# Altium PCB PCB1.PcbDoc (part 1 of 2)
Units mil, origin at the board's own origin, x right, y up, seen from the top; angles counter-clockwise.
Board outline 6000 x 4000 mil, 2 copper layers (Top Layer, Bottom Layer); 136 components, 92 nets, 517 pads, 0 vias.
Unrouted connection lines stored in the file: 335.
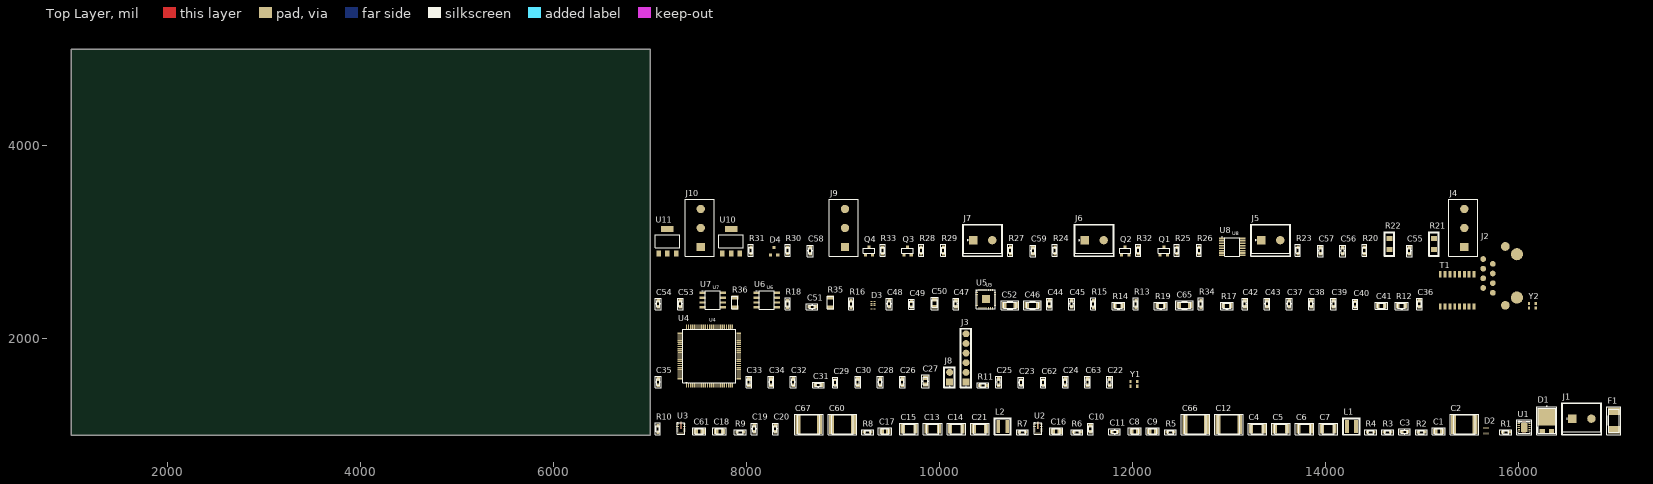
[diagram p0: Top Layer view]
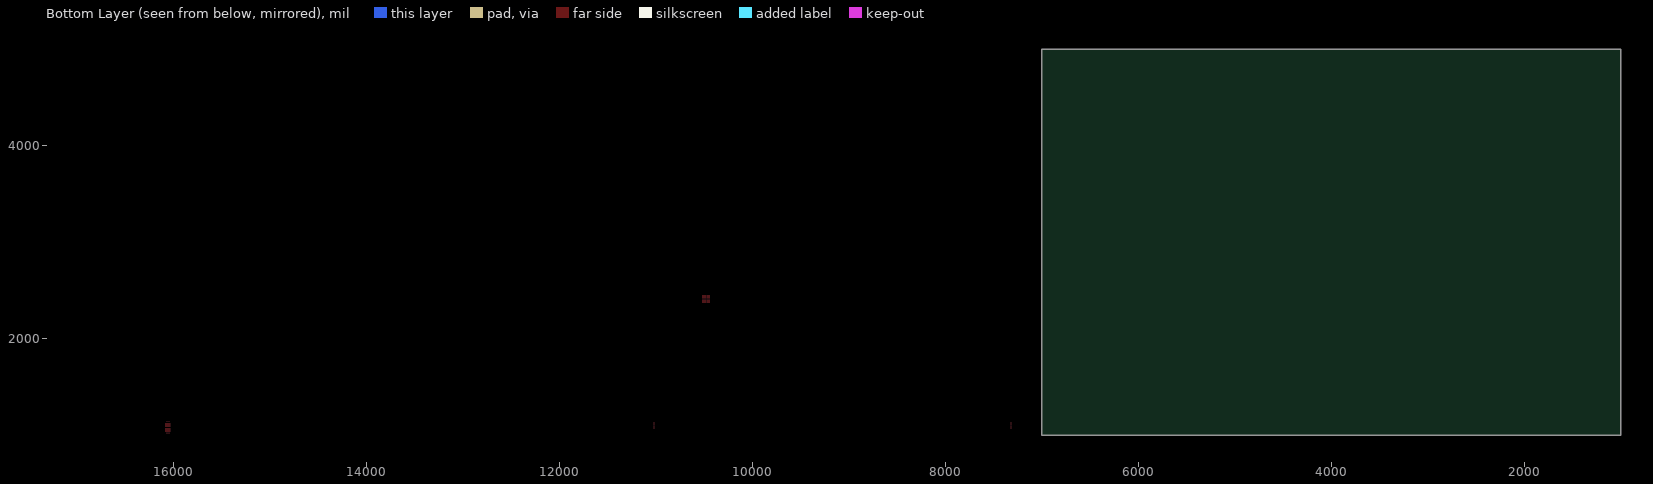
[diagram p1: Bottom Layer view, seen from below]

## Layer stack, top to bottom
Top Solder: solder mask 0.4, Solder Resist, Dk 3.5
Top Layer: signal copper 1.4
Dielectric 1: dielectric 12.6, FR-4, Dk 4.8
Bottom Layer: signal copper 1.4
Bottom Solder: solder mask 0.4, Solder Resist, Dk 3.5

## Board outline
1000,1000 7000,1000 7000,5000 1000,5000

## Design rules (kind name [scope] priority, off if disabled: settings)
Clearance [All] p1: gap=10 ignorepadtopadclearanceinfootprint=FALSE
PolygonConnect [All] p1: connectstyle=Relief reliefconductorwidth=10 reliefentries=4 polygonreliefangle="90 Angle" airgapwidth=10
RoutingVias [All] p1: holewidth=28 width=50 viastyle="Through Hole" minholewidth=28 minwidth=50 maxholewidth=28 maxwidth=50
SolderMaskExpansion [All] p1: expansion=0 istentingtop=FALSE
SupplyNets "Schematic Supply Nets_6" [InNet('3.3V')] p1: voltage=0.000
SupplyNets "Schematic Supply Nets_5" [InNet('B5_SW')] p2: voltage=0.000
SupplyNets "Schematic Supply Nets_4" [InNet('B3_SW')] p3: voltage=0.000
SupplyNets "Schematic Supply Nets_3" [InNet('24V')] p4: voltage=0.000
SupplyNets "Schematic Supply Nets_2" [InNet('VCAP')] p5: voltage=0.000
SupplyNets "Schematic Supply Nets_1" [InNet('5V')] p6: voltage=0.000
SupplyNets "Schematic Supply Nets" [InNet('GND')] p7: voltage=0.000
Width [All] p1: maxlimit=10 minlimit=10 preferedwidth=10
30 further rules are at their usual default settings.

## Classes and differential pairs
component class S4: C55 C56 C57 C58 C59 D4 J4 J5 J6 J7 J9 J10 Q1 Q2 Q3 Q4 R20 R21 R22 R23 R24 R25 R26 R27 R28 R29 R30 R31 R32 R33 U8 U10 U11
component class S3: C36 C37 C38 C39 C40 C41 C42 C43 C44 C45 C46 C47 C48 C49 C50 C51 C52 C53 C54 C65 D3 J2 R12 R13 R14 R15 R16 R17 R18 R19 R34 R35 R36 T1 U5 U6 U7 Y2
component class S2: C22 C23 C24 C25 C26 C27 C28 C29 C30 C31 C32 C33 C34 C35 C62 C63 J3 J8 R11 U4 Y1
component class S1: C1 C2 C3 C4 C5 C6 C7 C8 C9 C10 C11 C12 C13 C14 C15 C16 C17 C18 C19 C20 C21 C60 C61 C66 C67 D1 D2 F1 J1 L1 L2 R1 R2 R3 R4 R5 R6 R7 R8 R9 R10 U1 U2 U3

## Components (designator, comment, footprint, x,y, rotation, side; value= is the part's Value field where it differs from the comment)
C1 "C0805C224K1RACTU" GW_0805_KEMET_NOMINAL 15175,1040 r0 top value=220nF10%100VX7R
C2 "C5750X7R2A475K230KA" GW_C5750_TDK_REFLOW 15440,1110 r0 top value=4.7uF10%100VX7R
C3 "10 nF" GW_0603_KEMET_NOMINAL 14820,1035 r0 top
C4 "15 uF por unidad; 45 uF nominal banco" GW_C3225_TDK_REFLOW 13295,1065 r0 top
C5 "15 uF por unidad; 45 uF nominal banco" GW_C3225_TDK_REFLOW 13540,1065 r0 top
C6 "15 uF por unidad; 45 uF nominal banco" GW_C3225_TDK_REFLOW 13785,1065 r0 top
C7 "C3225X7R1C156M250AB" GW_C3225_TDK_REFLOW 14030,1065 r0 top value=15uF20%16VX7R
C8 "220 nF" GW_0805_KEMET_NOMINAL 12025,1040 r0 top
C9 "220 nF" GW_0805_KEMET_NOMINAL 12210,1040 r0 top
C10 "100 nF" GW_0603_KEMET_NOMINAL 11565,1065 r90 top
C11 "20 pF" GW_0603_KEMET_NOMINAL 11815,1035 r0 top
C12 "C5750X7R2A475K230KA" GW_C5750_TDK_REFLOW 13000,1110 r0 top value=4.7uF10%100VX7R
C13 "15 uF por unidad; 45 uF nominal banco" GW_C3225_TDK_REFLOW 9930,1065 r0 top
C14 "15 uF por unidad; 45 uF nominal banco" GW_C3225_TDK_REFLOW 10175,1065 r0 top
C15 "15 uF por unidad; 45 uF nominal banco" GW_C3225_TDK_REFLOW 9685,1065 r0 top
C16 "C0805C225K5RACTU" GW_0805_KEMET_NOMINAL 11210,1040 r0 top value=2.2uF10%50VX7R
C17 "C0805C224K1RACTU" GW_0805_KEMET_NOMINAL 9435,1040 r0 top value=220nF10%100VX7R
C18 "220 nF" GW_0805_KEMET_NOMINAL 7720,1040 r0 top
C19 "100 nF" GW_0603_KEMET_NOMINAL 8080,1065 r90 top
C20 "20 pF" GW_0603_KEMET_NOMINAL 8300,1065 r90 top
C21 "C3225X7R1C156M250AB" GW_C3225_TDK_REFLOW 10420,1065 r0 top value=15uF20%16VX7R
C22 "100 nF" GW_0603_KEMET_NOMINAL 11765,1550 r90 top
C23 "1 uF" GW_SAMSUNG_CL10_1608_REFLOW 10845,1545 r90 top
C24 "100 nF" GW_0603_KEMET_NOMINAL 11305,1550 r90 top
C25 "10 nF" GW_0603_KEMET_NOMINAL 10615,1550 r90 top
C26 "100 nF" GW_0603_KEMET_NOMINAL 9615,1550 r90 top
C27 "4.7 uF" GW_0805_KEMET_NOMINAL 9855,1560 r90 top
C28 "100 nF" GW_0603_KEMET_NOMINAL 9385,1550 r90 top
C29 "1 uF" GW_SAMSUNG_CL10_1608_REFLOW 8920,1545 r90 top
C30 "100 nF" GW_0603_KEMET_NOMINAL 9155,1550 r90 top
C31 "100 nF" GW_0603_KEMET_NOMINAL 8745,1520 r0 top
C32 "100 nF" GW_0603_KEMET_NOMINAL 8485,1550 r90 top
C33 "2.2 uF" GW_0603_KEMET_NOMINAL 8025,1550 r90 top
C34 "2.2 uF" GW_0603_KEMET_NOMINAL 8255,1550 r90 top
C35 "100 nF" GW_0603_KEMET_NOMINAL 7085,1550 r90 top
C36 "10 nF" GW_0603_KEMET_NOMINAL 14975,2360 r90 top
C37 "2 nF" GW_0603_KEMET_NOMINAL 13625,2360 r90 top
C38 "10 nF" GW_0603_KEMET_NOMINAL 13855,2360 r90 top
C39 "100 nF" GW_0603_KEMET_NOMINAL 14085,2360 r90 top
C40 "1 uF" GW_SAMSUNG_CL10_1608_REFLOW 14310,2355 r90 top
C41 "10 uF" GW_SAMSUNG_CL21_2012_REFLOW 14580,2340 r0 top
C42 "100 nF" GW_0603_KEMET_NOMINAL 13165,2360 r90 top
C43 "100 nF" GW_0603_KEMET_NOMINAL 13395,2360 r90 top
C44 "100 nF" GW_0603_KEMET_NOMINAL 11140,2360 r90 top
C45 "100 nF" GW_0603_KEMET_NOMINAL 11370,2360 r90 top
C46 "C1206C102KGRACAUTO" GW_C1206_KEMET_C1076_DENSITY_B 10965,2345 r0 top value="1 nF"
C47 "10 nF" GW_0603_KEMET_NOMINAL 10170,2360 r90 top
C48 "100 nF" GW_0603_KEMET_NOMINAL 9480,2360 r90 top
C49 "1 uF" GW_SAMSUNG_CL10_1608_REFLOW 9710,2355 r90 top
C50 "10 uF" GW_SAMSUNG_CL21_2012_REFLOW 9950,2365 r90 top
C51 "100 nF" GW_0603_KEMET_NOMINAL 8680,2330 r0 top
C52 "C1206C102KGRACAUTO" GW_C1206_KEMET_C1076_DENSITY_B 10730,2345 r0 top value="1 nF"
C53 "100 nF" GW_0603_KEMET_NOMINAL 7315,2360 r90 top
C54 "100 nF" GW_0603_KEMET_NOMINAL 7085,2360 r90 top
C55 "10 nF" GW_0603_KEMET_NOMINAL 14870,2910 r90 top
C56 "100 nF" GW_0603_KEMET_NOMINAL 14180,2910 r90 top
C57 "10 nF" GW_0603_KEMET_NOMINAL 13950,2910 r90 top
C58 "100 nF" GW_0603_KEMET_NOMINAL 8660,2910 r90 top
C59 "100 nF" GW_0603_KEMET_NOMINAL 10970,2910 r90 top
C60 "C5750X7R2A475K230KA" GW_C5750_TDK_REFLOW 8995,1110 r0 top value=4.7uF10%100VX7R
C61 "C0805C225K5RACTU" GW_0805_KEMET_NOMINAL 7510,1040 r0 top value=2.2uF10%50VX7R
C62 "1 uF" GW_SAMSUNG_CL10_1608_REFLOW 11075,1545 r90 top
C63 "100 nF" GW_0603_KEMET_NOMINAL 11535,1550 r90 top
C65 "C1206C102KGRACAUTO" GW_C1206_KEMET_C1076_DENSITY_B 12540,2345 r0 top value="1 nF"
C66 "C5750X7R2A475K230KA" GW_C5750_TDK_REFLOW 12655,1110 r0 top value=4.7uF10%100VX7R
C67 "C5750X7R2A475K230KA" GW_C5750_TDK_REFLOW 8645,1110 r0 top value=4.7uF10%100VX7R
D1 "SS3P6L-M3_86A" GW_SS3P6L_VISHAY_88987 16295,1190 r0 top
D2 "TDS3311P.C" GW_TDS3311P_SEMTECH 15665,1045 r0 top value="33V working;42Vmax specified35A pulse"
D3 "TPD4E05U06DQAR" GW_DQA0010A_TI 9310,2345 r0 top
D4 "CDSOT23-SM712" GW_SM712_BOURNS 8285,2905 r0 top
F1 "0451002.MRL" GW_0451_LITTELFUSE 16990,1150 r90 top
J1 "TB002-500-02BE" GW_TB002_500_2P_SAMESKY 16560,1170 r0 top
J2 "SS-7188S-A-NF" GW_SS7188SANF_STEWART 15985,2425 r90 top
J3 "6 posiciones" GW_WRPHD_6X1_254_WURTH 10275,1550 r90 top
J4 "TB002-500-03BE" GW_TB002_500_3P_SAMESKY 15440,2950 r90 top value="3-pole5mm terminal block"
J5 "TB002-500-02BE" GW_TB002_500_2P_SAMESKY 13335,3020 r0 top value="2-pole5mm terminal block"
J6 "TB002-500-02BE" GW_TB002_500_2P_SAMESKY 11505,3020 r0 top value="2-pole5mm terminal block"
J7 "TB002-500-02BE" GW_TB002_500_2P_SAMESKY 10350,3020 r0 top value="2-pole5mm terminal block"
J8 "2 posiciones" GW_WRPHD_2X1_254_WURTH 10105,1550 r90 top
J9 "TB002-500-03BE" GW_TB002_500_3P_SAMESKY 9020,2950 r90 top value="3-pole5mm terminal block"
J10 "TB002-500-03BE" GW_TB002_500_3P_SAMESKY 7525,2950 r90 top value="3-pole5mm terminal block"
L1 "6.8 uH" GW_XAL4030_COILCRAFT 14270,1090 r0 top
L2 "10 uH" GW_XAL4040_COILCRAFT 10655,1090 r0 top
Q1 "MMBT3904-7-F" GW_MMBT3904_BEC_DIODES 12325,2910 r0 top value="NPN 40V200mA"
Q2 "DMP2035U-7" GW_DMP2035U_GSD_DIODES 11925,2910 r0 top value=PMOS20V;VGS±10V
Q3 "MMBT3904-7-F" GW_MMBT3904_BEC_DIODES 9670,2910 r0 top value="NPN 40V200mA"
Q4 "DMP2035U-7" GW_DMP2035U_GSD_DIODES 9270,2910 r0 top value=PMOS20V;VGS±10V
R1 "RC0603FR-07768KL" GW_RC0603_YAGEO_REFLOW 15870,1030 r0 top value=768kOhm1%0.1W75V
R2 "RC0603FR-0713K3L" GW_RC0603_YAGEO_REFLOW 14995,1030 r0 top value=13.3kOhm1%0.1W75V
R3 "RC0603FR-0733K2L" GW_RC0603_YAGEO_REFLOW 14645,1030 r0 top value=33.2kOhm1%0.1W75V
R4 "RC0603FR-0730K1L" GW_RC0603_YAGEO_REFLOW 14470,1030 r0 top value=30.1kOhm1%0.1W75V
R5 "100 kOhm" GW_RC0603_YAGEO_REFLOW 12395,1030 r0 top
R6 "100 kOhm" GW_RC0603_YAGEO_REFLOW 11425,1030 r0 top
R7 "43.2 kOhm" GW_RC0603_YAGEO_REFLOW 10860,1030 r0 top
R8 "100 kOhm" GW_RC0603_YAGEO_REFLOW 9255,1030 r0 top
R9 "100 kOhm" GW_RC0603_YAGEO_REFLOW 7935,1030 r0 top
R10 "24.9 kOhm" GW_RC0603_YAGEO_REFLOW 7080,1065 r90 top
R11 "10 kOhm" GW_RC0603_YAGEO_REFLOW 10450,1515 r0 top
R12 "CRCW080575R0FKEA" GW_CRCW0805_VISHAY_20035_REFLOW 14790,2340 r0 top value="75 Ohm"
R13 "6.49 kOhm" GW_RC0603_YAGEO_REFLOW 12035,2360 r90 top
R14 "CRCW080575R0FKEA" GW_CRCW0805_VISHAY_20035_REFLOW 11855,2340 r0 top value="75 Ohm"
R15 "2.49 kOhm" GW_RC0603_YAGEO_REFLOW 11595,2360 r90 top
R16 "10 kOhm" GW_RC0603_YAGEO_REFLOW 9085,2360 r90 top
R17 "CRCW080575R0FKEA" GW_CRCW0805_VISHAY_20035_REFLOW 12980,2340 r0 top value="75 Ohm"
R18 "10 kOhm" GW_RC0603_YAGEO_REFLOW 8425,2360 r90 top
R19 "CRCW080575R0FKEA" GW_CRCW0805_VISHAY_20035_REFLOW 12295,2340 r0 top value="75 Ohm"
R20 "562 Ohm" GW_RC0603_YAGEO_REFLOW 14405,2915 r90 top
R21 "MM204F1K00TKRTR3K0" GW_MM204_FIRSTOHM 15125,2980 r90 top
R22 "MM204F1K00TKRTR3K0" GW_MM204_FIRSTOHM 14665,2980 r90 top
R23 "562 Ohm" GW_RC0603_YAGEO_REFLOW 13715,2915 r90 top
R24 "10 kOhm" GW_RC0603_YAGEO_REFLOW 11195,2915 r90 top
R25 "RC0603FR-07100RL" GW_RC0603_YAGEO_REFLOW 12460,2915 r90 top value="100 Ohm"
R26 "RC0603FR-074K7L" GW_RC0603_YAGEO_REFLOW 12690,2915 r90 top value="4.7 kOhm"
R27 "2.49 kOhm" GW_RC0603_YAGEO_REFLOW 10735,2915 r90 top
R28 "RC0603FR-07100RL" GW_RC0603_YAGEO_REFLOW 9810,2915 r90 top value="100 Ohm"
R29 "RC0603FR-074K7L" GW_RC0603_YAGEO_REFLOW 10040,2915 r90 top value="4.7 kOhm"
R30 "10 kOhm" GW_RC0603_YAGEO_REFLOW 8425,2915 r90 top
R31 "2.49 kOhm" GW_RC0603_YAGEO_REFLOW 8045,2915 r90 top
R32 "RC0603FR-074K7L" GW_RC0603_YAGEO_REFLOW 12060,2915 r90 top value="4.7 kOhm"
R33 "RC0603FR-074K7L" GW_RC0603_YAGEO_REFLOW 9410,2915 r90 top value="4.7 kOhm"
R34 "RC0603FR-071ML" GW_RC0603_YAGEO_REFLOW 12710,2360 r90 top
R35 "CRCW1206120RFKEA" GW_CRCW1206_VISHAY_20035_REFLOW 8870,2375 r90 top value="120 Ohm"
R36 "CRCW1206120RFKEA" GW_CRCW1206_VISHAY_20035_REFLOW 7880,2375 r90 top value="120 Ohm"
T1 "HX1188FNL" GW_HX1188FNL_PULSE 15365,2500 r0 top
U1 "TPS26620DRCR" GW_DRC0010J_TI_TPS2662_EPU 16060,1080 r0 top
U2 "LMR36015FBRNXR" GW_RNX0012A_TI 11020,1070 r0 top
U3 "LMR36015FBRNXR" GW_RNX0012A_TI 7320,1070 r0 top
U4 "STM32H723VET6" GW_LQFP100_ST_1L 7615,1820 r0 top
U5 "DP83826IRHBR" GW_RHB0032M_TI 10480,2410 r0 top
U6 "THVD1420DR" GW_SOIC8_1P27_5P4 8210,2400 r0 top
U7 "ATA6561-GAQW" GW_SOIC8_1P27_5P4 7650,2400 r0 top
U8 "ISO1212DBQR" GW_DBQ0016A_TI 13035,2950 r0 top
U10 "BSP75NTA" GW_BSP75N_SOT223_DN_DIODES 7840,3010 r0 top
U11 "BSP75NTA" GW_BSP75N_SOT223_DN_DIODES 7180,3010 r0 top
Y1 "KC2016Z25.0000C15XXK" GW_KC2016Z_KYOCERA 12015,1530 r0 top
Y2 "KC2016Z25.0000C15XXK" GW_KC2016Z_KYOCERA 16145,2340 r0 top

## Footprints (in the part's own frame and the unit in brackets; to place one, negate y for a bottom-side part, rotate by r counter-clockwise, add the part's x,y. Pads: shape width x height; smd on the part's side, far side on the other; paste and mask are expansions set on the pad)
GW_0451_LITTELFUSE [mm] "Littelfuse451/453 manufacturer recommended pad layout; saved historical p371; current2025p4 identical dimension list; Nonpolar project1/2; pad1.955x3.15 rounds1.96; centers4.905; outside6.86,inside2.95. No holder."
  rect 1.955x3.15 smd paste+0 mask+0.025: 1(-2.452,0) 2(2.452,0)
  silkscreen extent -3.68,-1.83 3.68,1.83, body extent -3.05,-1.35 3.05,1.35, height 2.69
GW_0603_KEMET_NOMINAL [mm] "KEMET C0603C680J5GACTU exact manufacturer spec; shared1608 body; KEMET C1027Table3p12 nominal1608 lands; Nominal C=.80,Y=.95,X=1.00; manufacturer land geometry reused for same0603 body. Timing option DNP."
  rect 0.95x1 smd paste+0 mask+0.025: 1(-0.8,0) 2(0.8,0)
  silkscreen extent -1.53,-0.75 1.53,0.75, body extent -0.8,-0.4 0.8,0.4, height 0.87
GW_0805_KEMET_NOMINAL [mm] "KEMET exact0805 spec body/termination dimensions; KEMET C1027 p12 Table3 nominal2012 reflow lands transferred to mechanically matching commercial0805; Nominal C=.90,Y=1.15,X=1.45. Mechanical reuse from KEMET table; no COTS electrical qualification claimed; same2012case checked."
  rect 1.15x1.45 smd paste+0 mask+0.025: 1(-0.9,0) 2(0.9,0)
  silkscreen extent -1.73,-0.97 1.73,0.97, body extent -1,-0.63 1,0.63, height 1.4
GW_BSP75N_SOT223_DN_DIODES [mm] "Diodes DS33016 Rev7-2 Jan2024 p1 Top View Pin Out, p8 Suggested Pad Layout; functional pad identifiers preserve original symbol pins; C2.30 C1=6.40 X1.20 X1=3.30 Y1.60 Y1=1.60 Y2=8.00mm; mask+.05/paste1:1 explicit prototype process."
  rect 1.2x1.6 smd paste+0 mask+0.05: D(0,-3.2) IN(-2.3,-3.2) S(2.3,-3.2)
  rect 3.3x1.6 smd paste+0 mask+0.05: S_TAB(0,3.2)
  silkscreen extent -3.25,-1.75 3.25,1.75
GW_C1206_KEMET_C1076_DENSITY_B [mm] "KEMET C1076p10 Table3 DensityB1206:C1.50,Y1.15,X1.80mm; centers3.00; gap1.85; body3.2x1.6mm. Mask+.05/paste1:1 process choices, not safety insulation geometry."
  rect 1.15x1.8 smd paste+0 mask+0.05: 1(-1.5,0) 2(1.5,0)
  silkscreen extent -2.32,-1.15 2.32,1.15, body extent -1.6,-0.8 1.6,0.8, height 1.8
GW_C3225_TDK_REFLOW [mm] "TDK official C3225X7R1C156M250AB product page lands PA2.0-2.4 PB1.0-1.2 PC1.9-2.5; TI table10-1 rated45uF example; Selected PA2.20 gap/PB1.10 padlength/PC2.50 height, no generic1210 default; 16V output only."
  rect 1.1x2.5 smd paste+0 mask+0.025: 1(-1.65,0) 2(1.65,0)
  silkscreen extent -2.45,-1.5 2.45,1.5, body extent -1.6,-1.25 1.6,1.25, height 2.5
GW_C5750_TDK_REFLOW [mm] "TDK C5750X7R2A475K230KA exact2014web-derived PDF p1 lands,p2 DCbias; current official product page same PA/PB/PC; Selected PA4.40 gap/PB1.30 length/PC5.00 height within manufacturer4.1-4.8/1.2-1.4/4-5 ranges."
  rect 1.3x5 smd paste+0 mask+0.025: 1(-2.85,0) 2(2.85,0)
  silkscreen extent -3.75,-2.75 3.75,2.75, body extent -2.85,-2.5 2.85,2.5, height 2.3
GW_CRCW0805_VISHAY_20035_REFLOW [mm] "Vishay20035p9 reflow0805 G1.00 Y0.95 X1.45 Z2.90mm; centers1.95mm; body2.0x1.25mm. Mask+.05/paste1:1 prototype process choices."
  rect 0.95x1.45 smd paste+0 mask+0.05: 1(-0.975,0) 2(0.975,0)
  silkscreen extent -1.7,-0.97 1.7,0.97, body extent -1,-0.63 1,0.63, height 0.55
GW_CRCW1206_VISHAY_20035_REFLOW [mm] "Vishay20035p9 REFLOW1206 G1.50 Y1.05 X1.80 Z3.60mm;centres2.55mm;body3.2x1.6mm. Mask+.05/paste1:1 prototype process."
  rect 1.05x1.8 smd paste+0 mask+0.05: 1(-1.275,0) 2(1.275,0)
  silkscreen extent -1.6,-0.8 1.6,0.8
GW_DBQ0016A_TI [mil] "SLLSEY7G table4-2 p4; DBQ0016A 4214846/A PDF pp44-46;"
  rrect25% 63x16 smd paste+0 mask+2: 1(-106.3,87.5) 2(-106.3,62.5) 3(-106.3,37.5) 4(-106.3,12.5) 5(-106.3,-12.5) 6(-106.3,-37.5) 7(-106.3,-62.5) 8(-106.3,-87.5) 9(106.3,-87.5) 10(106.3,-62.5) 11(106.3,-37.5) 12(106.3,-12.5) 13(106.3,12.5) 14(106.3,37.5) 15(106.3,62.5) 16(106.3,87.5)
  silkscreen extent -114,-96 77,107
GW_DMP2035U_GSD_DIODES [mm] "Diodes DS31830 Rev11-2 June2025 p1 top view/order,p2 electrical,p6 suggested lands; lower-left B/G,lower-right E/S,upper C/D; functional IDs intentional. C2.0 X.8 X1=1.35 Y.9 Y1=2.9mm; mask+.05,paste1:1."
  rect 0.8x0.9 smd paste+0 mask+0.05: D(0,1) G(-0.95,-1) S(0.95,-1)
  silkscreen extent -1.5,-0.7 1.5,0.7
GW_DQA0010A_TI [mm] "TI SLVSBO7O DQA0010A board/stencil pp29-30;0.565x0.2 leads,3/8=0.565x0.4;pitch0.5,row0.835mm. R0.05typ usingAltiumhalf-side50/25percent,NSMD+.05. GNDpaste0.565x0.36 windows,0.10mm stencil."
  rrect50% 0.565x0.2 smd paste+0 mask+0.05: 1(-0.417,1) 2(-0.417,0.5) 4(-0.417,-0.5) 5(-0.417,-1) 6(0.417,-1) 7(0.417,-0.5) 9(0.417,0.5) 10(0.417,1)
  rrect25% 0.565x0.4 smd paste-1 mask+0.05: 3(-0.417,0) 8(0.417,0)
GW_DRC0010J_TI_TPS2662_EPU [mm] "TI SLVSDT4F DRC0010J pp43-45 copper of GW_DRC0010J_TI_TPS2662_EP11 with EP segments 11A-11D renamed to 11 so all five EP copper pieces inherit pin 11 (RTN_EP / EF_RTN) through same-designator pads."
  rrect42% 0.6x0.24 smd paste+0 mask+0.05: 1(-1.4,1) 2(-1.4,0.5) 3(-1.4,0) 4(-1.4,-0.5) 5(-1.4,-1) 6(1.4,-1) 7(1.4,-0.5) 8(1.4,0) 9(1.4,0.5) 10(1.4,1)
  rrect40% 0.25x0.51 smd paste-1 mask+0.05: 11(-0.25,-1.445) 11(-0.25,1.445) 11(0.25,-1.445) 11(0.25,1.445)
  rrect6% 1.65x2.4 smd paste-1 mask+0.05: 11(0,0)
  Top Layer region: 0.125,1.36 0.375,1.36 0.375,1.7 0.125,1.7
  Top Layer region: 0.125,-1.7 0.375,-1.7 0.375,-1.36 0.125,-1.36
  Top Layer region: -0.375,1.36 -0.125,1.36 -0.125,1.7 -0.375,1.7
  Top Layer region: -0.375,-1.7 -0.125,-1.7 -0.125,-1.36 -0.375,-1.36
  Top Layer region: -0.75,0.1 0.75,0.1 0.75,1.16 -0.75,1.16
  Top Layer region: -0.75,-1.16 0.75,-1.16 0.75,-0.1 -0.75,-0.1
  silkscreen extent -1.95,-1.95 1.95,1.95, body extent -1.5,-1.5 1.5,1.5, height 1
GW_HX1188FNL_PULSE [mil] "Pulse HX1188FNL revB 30-May-2014 sheets2-3 PS-2005.002-D; 16 lands; 1.27mm pitch, .762x1.651mm; row centers +/-4.2545mm. No metal-under-transformer keepout encoded: board gate."
  rect 30x65 smd: 1(-175,-167.5) 2(-125,-167.5) 3(-75,-167.5) 4(-25,-167.5) 5(25,-167.5) 6(75,-167.5) 7(125,-167.5) 8(175,-167.5) 9(175,167.5) 10(125,167.5) 11(75,167.5) 12(25,167.5) 13(-25,167.5) 14(-75,167.5) 15(-125,167.5) 16(-175,167.5)
GW_KC2016Z_KYOCERA [mm] "Kyocera TNY1T-H1-DEX01-11 17-Jul-2026 pp4,6 table2 fig4; Top view derived by mirroring numbered bottom view; 1=STANDBY,2=GND,3=OUT,4=VCC; no crystal load pads."
  rect 0.6x0.8 smd: 1(-0.9,-0.6) 2(0.9,-0.6) 3(0.9,0.6) 4(-0.9,0.6)
GW_LQFP100_ST_1L [mm] "DS13313 Rev5 fig5, table7 pp57-71, fig65 p218 (PDF p219); Copper matches ST fig65; mask +0.05mm and 1:1 paste are explicit engineering choices, assembly/fab review pending, not manufacturer-qualified mask/stencil."
  rrect33% 0.3x1.2 smd paste+0 mask+0.05: 1(-6,-7.75) 2(-5.5,-7.75) 3(-5,-7.75) 4(-4.5,-7.75) 5(-4,-7.75) 6(-3.5,-7.75) 7(-3,-7.75) 8(-2.5,-7.75) 9(-2,-7.75) 10(-1.5,-7.75) 11(-1,-7.75) 12(-0.5,-7.75) 13(0,-7.75) 14(0.5,-7.75) 15(1,-7.75) 16(1.5,-7.75) 17(2,-7.75) 18(2.5,-7.75) 19(3,-7.75) 20(3.5,-7.75) 21(4,-7.75) 22(4.5,-7.75) 23(5,-7.75) 24(5.5,-7.75) 25(6,-7.75) 51(6,7.75) 52(5.5,7.75) 53(5,7.75) 54(4.5,7.75) 55(4,7.75) 56(3.5,7.75) 57(3,7.75) 58(2.5,7.75) 59(2,7.75) 60(1.5,7.75) 61(1,7.75) 62(0.5,7.75) 63(0,7.75) 64(-0.5,7.75) 65(-1,7.75) 66(-1.5,7.75) 67(-2,7.75) 68(-2.5,7.75) 69(-3,7.75) 70(-3.5,7.75) 71(-4,7.75) 72(-4.5,7.75) 73(-5,7.75) 74(-5.5,7.75) 75(-6,7.75)
  rrect33% 1.2x0.3 smd paste+0 mask+0.05: 26(7.75,-6) 27(7.75,-5.5) 28(7.75,-5) 29(7.75,-4.5) 30(7.75,-4) 31(7.75,-3.5) 32(7.75,-3) 33(7.75,-2.5) 34(7.75,-2) 35(7.75,-1.5) 36(7.75,-1) 37(7.75,-0.5) 38(7.75,0) 39(7.75,0.5) 40(7.75,1) 41(7.75,1.5) 42(7.75,2) 43(7.75,2.5) 44(7.75,3) 45(7.75,3.5) 46(7.75,4) 47(7.75,4.5) 48(7.75,5) 49(7.75,5.5) 50(7.75,6) 76(-7.75,6) 77(-7.75,5.5) 78(-7.75,5) 79(-7.75,4.5) 80(-7.75,4) 81(-7.75,3.5) 82(-7.75,3) 83(-7.75,2.5) 84(-7.75,2) 85(-7.75,1.5) 86(-7.75,1) 87(-7.75,0.5) 88(-7.75,0) 89(-7.75,-0.5) 90(-7.75,-1) 91(-7.75,-1.5) 92(-7.75,-2) 93(-7.75,-2.5) 94(-7.75,-3) 95(-7.75,-3.5) 96(-7.75,-4) 97(-7.75,-4.5) 98(-7.75,-5) 99(-7.75,-5.5) 100(-7.75,-6)
  silkscreen extent -7,-7 7,7
GW_MM204_FIRSTOHM [mm] "Firstohm MM rev08-March-2023 printedpp75-78; p78 reflow pad table MM16/MM204; Reflow minimum lands1.3x1.6, inner spacing1.6mm; nonpolar numbering project1/2. Pulse qualification separate."
  rect 1.3x1.6 smd: 1(-1.45,0) 2(1.45,0)
  silkscreen extent -3.2,-1.35 3.2,1.35, body extent -2.95,-1.1 2.95,1.1, height 2.2
GW_MMBT3904_BEC_DIODES [mm] "Diodes DS30036 Rev27-2 March2025 p1 top view/order, p3 electrical, p6 suggested lands; lower-left B/G,lower-right E/S,upper C/D; functional IDs intentional. C2.0 X.8 X1=1.35 Y.9 Y1=2.9mm; mask+.05,paste1:1."
  rect 0.8x0.9 smd paste+0 mask+0.05: B(-0.95,-1) C(0,1) E(0.95,-1)
  silkscreen extent -1.5,-0.7 1.5,0.7
GW_RC0603_YAGEO_REFLOW [mm] "Yageo Mounting13-Feb-2018 V10 p4 Fig4/Table1; exact62k/15k manufacturer spec sheets; A2.6 overall,B.8 innergap,C.9 padwidth,D.8 padheight; no generic0603 default."
  rect 0.9x0.8 smd paste+0 mask+0.025: 1(-0.85,0) 2(0.85,0)
  silkscreen extent -1.55,-0.65 1.55,0.65, body extent -0.8,-0.4 0.8,0.4, height 0.55
GW_RHB0032M_TI [mm] "SNLS647I table5-1 pp5-6; exposed pad p7; RHB0032M 4223725/A PDF pp111-113; EP33 paste suppressed; four .94mm square paste windows at +/- .57mm (TI 80% example). No automatic thermal-via drill holes."
  rrect40% 0.6x0.25 smd paste+0 mask+0.05: 1(-2.4,1.75) 2(-2.4,1.25) 3(-2.4,0.75) 4(-2.4,0.25) 5(-2.4,-0.25) 6(-2.4,-0.75) 7(-2.4,-1.25) 8(-2.4,-1.75) 17(2.4,-1.75) 18(2.4,-1.25) 19(2.4,-0.75) 20(2.4,-0.25) 21(2.4,0.25) 22(2.4,0.75) 23(2.4,1.25) 24(2.4,1.75)
  rrect40% 0.25x0.6 smd paste+0 mask+0.05: 9(-1.75,-2.4) 10(-1.25,-2.4) 11(-0.75,-2.4) 12(-0.25,-2.4) 13(0.25,-2.4) 14(0.75,-2.4) 15(1.25,-2.4) 16(1.75,-2.4) 25(1.75,2.4) 26(1.25,2.4) 27(0.75,2.4) 28(0.25,2.4) 29(-0.25,2.4) 30(-0.75,2.4) 31(-1.25,2.4) 32(-1.75,2.4)
  rect 2.1x2.1 smd paste-1.05 mask+0.05: 33(0,0)
  Top Layer region: 0.1,0.1 1.04,0.1 1.04,1.04 0.1,1.04
  Top Layer region: 0.1,-1.04 1.04,-1.04 1.04,-0.1 0.1,-0.1
  Top Layer region: -1.04,0.1 -0.1,0.1 -0.1,1.04 -1.04,1.04
  Top Layer region: -1.04,-1.04 -0.1,-1.04 -0.1,-0.1 -1.04,-0.1
  silkscreen extent -2.6,-2.5 2.5,2.5
GW_RNX0012A_TI [mm] "SNVSB49D p4; RNX0012A 4222858/A PDF pp44-46 and RNX0012B 4223969/C pp47-49; Confirm actual RNX revision before use. Pin12 SW: no ground tab. Paste12 suppressed, two .25x.812mm windows at y=.2815,1.2935 per drawing; 0.125mm stencil."
  rrect57% 0.7x0.35 smd paste+0 mask-0.05: 1(-0.9,1.125) 2(-0.9,0.475) 10(0.9,0.475) 11(0.9,1.125)
  rrect40% 0.6x0.25 smd paste+0 mask+0.05: 3(-0.9,-0.175) 4(-0.9,-0.675) 8(0.9,-0.675) 9(0.9,-0.175)
  rrect40% 0.25x0.6 smd paste+0 mask+0.05: 5(-0.5,-1.4) 6(0,-1.4) 7(0.5,-1.4)
  rrect57% 0.35x1.925 smd paste-1 mask-0.05: 12(0,0.787)
  Top Layer region: -0.125,0.887 0.125,0.887 0.125,1.699 -0.125,1.699
  Top Layer region: -0.125,-0.125 0.125,-0.125 0.125,0.687 -0.125,0.687
  silkscreen extent -1.1,-1.5 1,1.6
GW_SAMSUNG_CL10_1608_REFLOW [mm] "SamsungMLCC_2401Jan2024p159reflow;1608+/-0.10:a.63-.73,b.71-.81,c.80-.90mm;selectedmidpointswithinranges. Pin1/2nonpolarprojectconvention;mask+.05,paste1:1."
  rect 0.76x0.85 smd paste+0 mask+0.05: 1(-0.72,0) 2(0.72,0)
  silkscreen extent -1.35,-0.67 1.35,0.67, body extent -0.8,-0.4 0.8,0.4, height 0.9
GW_SAMSUNG_CL21_2012_REFLOW [mm] "SamsungMLCC_2401Jan2024p159reflow;2012+/-0.20:a.83-.93,b.91-1.01,c1.35-1.45mm;selectedmidpointswithinranges. Pin1/2nonpolarprojectconvention;mask+.05,paste1:1."
  rect 0.96x1.4 smd paste+0 mask+0.05: 1(-0.92,0) 2(0.92,0)
  silkscreen extent -1.65,-0.95 1.65,0.95, body extent -1,-0.63 1,0.63, height 1.45
GW_SM712_BOURNS [mm] "Bourns CDSOT23-SM712 saved2026-11-07 pp1-2 pin diagram and Recommended Footprint; Pins1/2 bus;3 reference. +/-7/12V asymmetric clamp. Not a generic SOT23 substitution."
  rect 0.85x0.85 smd: 1(-0.95,-1) 2(0.95,-1) 3(0,1)
GW_SOIC8_1P27_5P4 [mm] "SLLSF78B table4-1 p3; D0008A 4214825/C PDF pp30-32; DS20005991B pin table p3; C04-2057-OA RevE p19;"
  rrect17% 1.55x0.6 smd paste+0 mask+0.07: 1(-2.7,1.905) 2(-2.7,0.635) 3(-2.7,-0.635) 4(-2.7,-1.905) 5(2.7,-1.905) 6(2.7,-0.635) 7(2.7,0.635) 8(2.7,1.905)
  silkscreen extent -2.9,-2.45 1.95,2.5
GW_SS3P6L_VISHAY_88987 [mm] "Vishay88987 Rev24-Apr-2020 pp1,4; numbered anodes1/2, cathodeK; minimum mounting lands; K large upper pad,1 lower right,2 lower left in package-view orientation. Small-pad gap1.04; overallheight6.80. OriginK center. Board thermal copper and stencil pending. Reject supplied VIS mapping."
  rect 1.4x1.27 smd: 1(1.22,-3.805) 2(-1.22,-3.805)
  rect 4.8x4.72 smd: K(0,0)
  silkscreen extent -2.65,-4.69 2.65,2.81, body extent -2.3,-4.29 2.3,2.21, height 1.2
GW_SS7188SANF_STEWART [mm] "Cinch/Stewart CT710001 revB0 10-Jul-2023 component-side recommended hole layout; Holes/positions from drawing; signal1..8=.89drill, shield1.57, mounts3.2NPTH. Copper lands1.5/2.3 are ENGINEERING CANDIDATES; fab annular ring/finished holes/body edge pending."
  round 1.5 smd: 1(1.27,6.35) 2(2.54,8.89) 3(3.81,6.35) 4(5.08,8.89) 5(6.35,6.35) 6(7.62,8.89) 7(8.89,6.35) 8(10.16,8.89)
  round 3.2 smd: MP1(0,0) MP2(11.43,0)
  round 2.3 smd: S1(-2.032,3.048) S2(13.462,3.048)
GW_TB002_500_2P_SAMESKY [mm] "Same Sky TB002-500 Rev1.04 09/12/2024 p1 order key,p2 PCB layout;5mm pitch,1.30mm drilled holes;2.20mm copper diameter prototype annular-ring choice;wire-entryfront=-Y;project assigns1left+Xsequence."
  rect 2.2x2.2 smd paste-10 mask+0.1: 1(0,0)
  round 2.2 smd paste-10 mask+0.1: 2(5,0)
  silkscreen extent -2.75,-4.25 7.75,4.25, body extent -2.5,-4 7.5,4, height 10
GW_TB002_500_3P_SAMESKY [mm] "Same Sky TB002-500 Rev1.04 09/12/2024 p1 order key,p2 PCB layout;5mm pitch,1.30mm drilled holes;2.20mm copper diameter prototype annular-ring choice;wire-entryfront=-Y;project assigns1left+Xsequence."
  rect 2.2x2.2 smd paste-10 mask+0.1: 1(0,0)
  round 2.2 smd paste-10 mask+0.1: 2(5,0) 3(10,0)
  silkscreen extent -2.5,-3.5 12.5,4.1
GW_TDS3311P_SEMTECH [mm] "Semtech TDS3311P Rev2.4 pp2,7-9; official product portal confirms33V orderTDS3311P.C; Manufacturer reference lands; all1/2/3GND and4/5/6IN. Mask+.025 and1:1paste are prototype process choices."
  rect 0.3x0.65 smd paste+0 mask+0.025: 1(-0.5,-0.725) 2(0,-0.725) 3(0.5,-0.725) 4(0.5,0.725) 5(0,0.725) 6(-0.5,0.725)
GW_WRPHD_2X1_254_WURTH [mm] "Wurth 61300211121 official datasheet p1 dimensions/recommended hole pattern;1.10mm holes2.54pitch;copper1.8mm diameter/mask+.1 prototype process selection;pin1markedend,sequence+X."
  rect 1.8x1.8 smd paste-10 mask+0.1: 1(0,0)
  round 1.8 smd paste-10 mask+0.1: 2(2.54,0)
  silkscreen extent -1.52,-1.52 4.06,1.52, body extent -1.27,-1.27 3.81,1.27, height 2.54
GW_WRPHD_6X1_254_WURTH [mm] "Wurth 61300611121 official datasheet p1 dimensions/recommended hole pattern;1.10mm holes2.54pitch;copper1.8mm diameter/mask+.1 prototype process selection;pin1markedend,sequence+X."
  rect 1.8x1.8 smd paste-10 mask+0.1: 1(0,0)
  round 1.8 smd paste-10 mask+0.1: 2(2.54,0) 3(5.08,0) 4(7.62,0) 5(10.16,0) 6(12.7,0)
  silkscreen extent -1.52,-1.52 14.22,1.52, body extent -1.27,-1.27 13.97,1.27, height 2.54
GW_XAL4030_COILCRAFT [mil] "Coilcraft document806-4 revised02/25/26 Recommended Land Pattern; Terminals assigned project1/2 for nonpolar winding; place high dv/dt at stripe/terminal1. Height 3.1mm. Mask/paste DFM pending."
  rect 38x134 smd: 1(-46.5,0) 2(46.5,0)
  silkscreen extent -89,-89 89,89, body extent -79,-79 79,79, height 122
GW_XAL4040_COILCRAFT [mil] "Coilcraft document806-4 revised02/25/26 Recommended Land Pattern; Terminals assigned project1/2 for nonpolar winding; place high dv/dt at stripe/terminal1. Height 4.1mm. Mask/paste DFM pending."
  rect 38x134 smd: 1(-46.5,0) 2(46.5,0)
  silkscreen extent -89,-89 89,89, body extent -79,-79 79,79, height 161

## Part data
C1 C17: "KEMET exact0805 spec body/termination dimensions; KEMET C1027 p12 Table3 nominal2012 reflow lands transferred to mechanically matching commercial0805; 220nF10%100VX7R;", Manufacturer=KEMET, CAD Status=CAD_VERIFIED, Design Approval=PROTOTYPE_APPROVED, Electrical Test=NOT_TESTED, Limitations=None, Manufacturer Part Number=C0805C224K1RACTU, Source="KEMET exact0805 spec body/termination dimensions, KEMET C1027 p12 Table3 nominal2012 reflow lands transferred to mechanically matching commercial0805"
C2 C12 C60 C66 C67: "TDK C5750X7R2A475K230KA exact2014web-derived PDF p1 lands,p2 DCbias; current official product page same PA/PB/PC; 4.7uF10%100VX7R;", Manufacturer=TDK, CAD Status=CAD_VERIFIED, Design Approval=PROTOTYPE_APPROVED, Electrical Test=NOT_TESTED, Limitations=None, Manufacturer Part Number=C5750X7R2A475K230KA, Source="TDK C5750X7R2A475K230KA exact2014web-derived PDF p1 lands,p2 DCbias, current official product page same PA/PB/PC"
C3 C25 C36 C38 C47 C55 C57: library part GW_C0603C103K1RACTU_97f3ee33, "C0603C103K1RACTU; 10 nF; 100 V; X7R; -55..125 C; CAD_CANDIDATE", Manufacturer=KEMET, Manufacturer Part Number=C0603C103K1RACTU, Package=0603, Power Rating=N/A, Rating="100 V; X7R; -55..125 C", Tolerance=10%, CAD_Limitations="Glyph pins/types inspected; exact manufacturer land-pattern/mask/paste qualification pending.", CAD_Source="Professor_shared.SchLib glyph Cap_0.1uF_0603_50V", CAD_Status=CAD_CANDIDATE, Electrical_Notes="Ficha KEMET local DI_CIN p1; no confundir con externo CL10B103KA8WPNC 25 V. Modelo candidato existente; sin cotejo visual de pads/pines en Altium.", Electrical_Status=PROVISIONAL
C4 C5 C6 C13 C14 C15: library part GW_C3225X7R1C156M250AB_bb412b42, "C3225X7R1C156M250AB; 15 uF por unidad; 45 uF nominal banco; 16 V; X7R; CAD_CANDIDATE", Manufacturer=TDK, Manufacturer Part Number=C3225X7R1C156M250AB, Package=1210, Power Rating=N/A, Rating="16 V; X7R", Tolerance=20%, CAD_Limitations="Symbol only. Exact manufacturer land pattern absent locally; footprint blocked. Ratings copied from provisional BOM, not newly approved.", CAD_Source="Professor_shared.SchLib glyph Cap_0.1uF_0603_50V", CAD_Status=CAD_BLOCKED, Electrical_Notes="Ceff a 3.3 V, ESR, escalon de carga y Bode pendientes. No atribuir 45 uF efectivos ni ESR3.04mOhm del modelo AR. Sin footprint1210 docente.", Electrical_Status=PROVISIONAL
C7 C21: "TDK official C3225X7R1C156M250AB product page lands PA2.0-2.4 PB1.0-1.2 PC1.9-2.5; TI table10-1 rated45uF example; 15uF20%16VX7R; 3 per buck:45uF rated per TI1MHz example. Prototype load-step/ripple confirmation pending; do not connect to24V input.", Manufacturer=TDK, CAD Status=CAD_VERIFIED, Design Approval=PROTOTYPE_APPROVED, Electrical Test=NOT_TESTED, Limitations="3 per buck:45uF rated per TI1MHz example. Prototype load-step/ripple confirmation pending, do not connect to24V input.", Manufacturer Part Number=C3225X7R1C156M250AB, Source="TDK official C3225X7R1C156M250AB product page lands PA2.0-2.4 PB1.0-1.2 PC1.9-2.5, TI table10-1 rated45uF example"
C8 C9 C18: library part GW_C0805C224K1RACTU_e16e52b8, "C0805C224K1RACTU; 220 nF; 100 V; X7R; CAD_CANDIDATE", Manufacturer=KEMET, Manufacturer Part Number=C0805C224K1RACTU, Package=0805, Power Rating=N/A, Rating="100 V; X7R", Tolerance=10%, CAD_Limitations="Glyph pins/types inspected; exact manufacturer land-pattern/mask/paste qualification pending.", CAD_Source="Professor_shared.SchLib glyph Cap_10uF_0805_25V_", CAD_Status=CAD_CANDIDATE, Electrical_Notes="Uno por par VIN-PGND en lados opuestos; falta Ceff y cotejo dimensiones pads. Modelo candidato existente; sin cotejo visual de pads/pines en Altium.", Electrical_Status=PROVISIONAL
C10 C19 C22 C24 C26 C28 C30 C31 C32 C35 C39 C42 C43 C44 C45 C48 C51 C53 C54 C56 C58 C59 C63: library part GW_C0603C104K5RACTU_dc5e12a5, "C0603C104K5RACTU; 100 nF; 50 V; X7R; -55..125 C; CAD_CANDIDATE", Manufacturer=KEMET, Manufacturer Part Number=C0603C104K5RACTU, Package=0603, Power Rating=N/A, Rating="50 V; X7R; -55..125 C", Tolerance=10%, CAD_Limitations="Glyph pins/types inspected; exact manufacturer land-pattern/mask/paste qualification pending.", CAD_Source="Professor_shared.SchLib glyph Cap_0.1uF_0603_50V", CAD_Status=CAD_CANDIDATE, Electrical_Notes="Ficha KEMET local p1. Adaptar parametros; no usar el Y5V 0603F104Z500CT como equivalente. Modelo candidato existente; sin cotejo visual de pads/pines en Altium.", Electrical_Status=PROVISIONAL
C11 C20: library part GW_C0603C200J5GACTU_c75b007a, "C0603C200J5GACTU; 20 pF; 50 V; C0G; CAD_CANDIDATE", Manufacturer=KEMET, Manufacturer Part Number=C0603C200J5GACTU, Package=0603, Power Rating=N/A, Rating="50 V; C0G", Tolerance=5%, CAD_Limitations="Glyph pins/types inspected; exact manufacturer land-pattern/mask/paste qualification pending.", CAD_Source="Professor_shared.SchLib glyph Cap_0.1uF_0603_50V", CAD_Status=CAD_CANDIDATE, Electrical_Notes="Valor guia fabricante; validar lazo. Con RFBT100k no obligatorio universal; reservar DNP hasta respuesta/Bode. Modelo candidato existente; sin cotejo visual de pads/pines en Altium.", Electrical_Status=PROVISIONAL
C16 C61: "KEMET exact0805 spec body/termination dimensions; KEMET C1027 p12 Table3 nominal2012 reflow lands transferred to mechanically matching commercial0805; 2.2uF10%50VX7R; VCC5V local bypass;2.2uF prototype selection replaces known insufficient1uF part. Assumed>=60% bias retention; verify stableVCC at bring-up.", Manufacturer=KEMET, CAD Status=CAD_VERIFIED, Design Approval=PROTOTYPE_APPROVED, Electrical Test=NOT_TESTED, Limitations="VCC5V local bypass,2.2uF prototype selection replaces known insufficient1uF part. Assumed>=60% bias retention, verify stableVCC at bring-up.", Manufacturer Part Number=C0805C225K5RACTU, Source="KEMET exact0805 spec body/termination dimensions, KEMET C1027 p12 Table3 nominal2012 reflow lands transferred to mechanically matching commercial0805"
C23 C29 C40 C49 C62: library part GW_CL10A105KB8NNNC_c3932faa, "CL10A105KB8NNNC; 1 uF; 50 V; X5R; -55..85 C; CAD_CANDIDATE", Manufacturer="Samsung Electro-Mechanics", Manufacturer Part Number=CL10A105KB8NNNC, Package=0603, Power Rating=N/A, Rating="50 V; X5R; -55..85 C", Tolerance=10%, CAD_Limitations="Glyph pins/types inspected; exact manufacturer land-pattern/mask/paste qualification pending.", CAD_Source="Professor_shared.SchLib glyph Cap_1uF_0603_50V", CAD_Status=CAD_CANDIDATE, Electrical_Notes="Samsung ficha oficial; Ceff/ESR pendientes por aplicacion. Limite X5R 85 C: no homologado para ambiente superior. Modelo candidato existente; sin cotejo visual de pads/pines en Altium.", Electrical_Status=PROVISIONAL
C27: library part GW_C0805C475K4RACTU_82374e08, "C0805C475K4RACTU; 4.7 uF; 16 V; X7R; CAD_CANDIDATE", Manufacturer=KEMET, Manufacturer Part Number=C0805C475K4RACTU, Package=0805, Power Rating=N/A, Rating="16 V; X7R", Tolerance=10%, CAD_Limitations="Glyph pins/types inspected; exact manufacturer land-pattern/mask/paste qualification pending.", CAD_Source="Professor_shared.SchLib glyph Cap_10uF_0805_25V_", CAD_Status=CAD_CANDIDATE, Electrical_Notes="Ceff a 3.3 V pendiente; no sustituir por 10 uF solo por disponibilidad. Modelo candidato existente; sin cotejo visual de pads/pines en Altium.", Electrical_Status=PROVISIONAL
C33 C34: library part GW_C0603C225K8RACTU_46503424, "C0603C225K8RACTU; 2.2 uF; 10 V; X7R; ESR <100 mOhm; CAD_CANDIDATE", Manufacturer=KEMET, Manufacturer Part Number=C0603C225K8RACTU, Package=0603, Power Rating=N/A, Rating="10 V; X7R; ESR <100 mOhm", Tolerance="10% candidato; ST permite 20%", CAD_Limitations="Glyph pins/types inspected; exact manufacturer land-pattern/mask/paste qualification pending.", CAD_Source="Professor_shared.SchLib glyph Cap_0.1uF_0603_50V", CAD_Status=CAD_CANDIDATE, Electrical_Notes="Falta ESR y capacitancia bajo VCORE/temperatura/envejecimiento. No conectar 3.3 V ni carga externa a VCAP. Modelo candidato existente; sin cotejo visual de pads/pines en Altium.", Electrical_Status=PROVISIONAL
C37: library part GW_C0603C202J5GACTU_fa733a70, "C0603C202J5GACTU; 2 nF; 50 V; C0G; CAD_CANDIDATE", Manufacturer=KEMET, Manufacturer Part Number=C0603C202J5GACTU, Package=0603, Power Rating=N/A, Rating="50 V; C0G", Tolerance="5% seleccion", CAD_Limitations="Glyph pins/types inspected; exact manufacturer land-pattern/mask/paste qualification pending.", CAD_Source="Professor_shared.SchLib glyph Cap_0.1uF_0603_50V", CAD_Status=CAD_CANDIDATE, Electrical_Notes="Conflicto EVM C57=100 nF; prevalece requisito actual 2 nF, no copiar C57. Modelo candidato existente; sin cotejo visual de pads/pines en Altium.", Electrical_Status=PROVISIONAL
C41 C50: library part GW_CL21A106KAYNNNE_c6e24382, "CL21A106KAYNNNE; 10 uF; 25 V; X5R; -55..85 C; CAD_CANDIDATE", Manufacturer="Samsung Electro-Mechanics", Manufacturer Part Number=CL21A106KAYNNNE, Package=0805, Power Rating=N/A, Rating="25 V; X5R; -55..85 C", Tolerance=10%, CAD_Limitations="Glyph pins/types inspected; exact manufacturer land-pattern/mask/paste qualification pending.", CAD_Source="Professor_shared.SchLib glyph Cap_10uF_0805_25V_", CAD_Status=CAD_CANDIDATE, Electrical_Notes="Ceff a 3.3 V y temperatura pendientes. No usar para entrada 30 V. Modelo candidato existente; sin cotejo visual de pads/pines en Altium.", Electrical_Status=PROVISIONAL
C46 C52 C65: "KEMET1nF10%2kVDCX7R1206; Ethernet chassis AC return; no safety-Y or surge claim", Dielectric=X7R, LCSC Part Number=C600002, Manufacturer=KEMET, Package="1206 /3216", Tolerance=10%, Voltage Rating="2000 VDC", Assembly="JLC Extended observed2026-11-07, quantity unknown, no stock reservation", CAD Status=CAD_VERIFIED, Datasheet=sources/ethernet_1nf/C600002.pdf, Electrical Approval="PROVISIONAL_APPLICATION, not safety-Y certified", Electrical Test=NOT_TESTED, Manufacturer Part Number=C1206C102KGRACAUTO, Source="KEMET C1076_X7R_HV_AUTO_SMD9/10/2019 pp1-2 ordering/rating,p4 body,p10 Table3 densityB1206, C600002 exact catalog identity", Terminal Mapping="Nonpolar, project1-left/2-right, symbol1->pad1,2->pad2"
D1: "User-approved series reverse diode:manufacturer1/2 anodes,K large cathode. Same model also reserved DNP output clamp; do not populateSOUT withoutVF review. No hot reverse while charged.", Manufacturer=Vishay, Manufacturer Part Number=SS3P6L-M3/86A, CAD Status=CAD_VERIFIED, Datasheet=sources/SS3P6L_88987.pdf, Design Approval=PROTOTYPE_APPROVED, Electrical Approval=PROTOTYPE_APPROVED, Electrical Test=NOT_TESTED, Limitations="User-approved series reverse diode:manufacturer1/2 anodes,K large cathode. Same model also reserved DNP output clamp, do not populateSOUT withoutVF review. No hot reverse while charged.", Source="Vishay88987 Rev24-Apr-2020 pp1,4, numbered anodes1/2, cathodeK, minimum mounting lands"
D2: "Semtech TDS3311P Rev2.4 pp2,7-9; official product portal confirms33V orderTDS3311P.C; 33V working;42Vmax specified35A pulse;", Manufacturer=Semtech, CAD Status=CAD_VERIFIED, Design Approval=PROTOTYPE_APPROVED, Electrical Test=NOT_TESTED, Limitations=None, Manufacturer Part Number=TDS3311P.C, Source="Semtech TDS3311P Rev2.4 pp2,7-9; official product portal confirms33V orderTDS3311P.C"
D3: "TI SLVSBO7O table4-2 p4; DQA0010A 4220328/A board/stencil pp29-30; PHY-side only, per DP83826EVM sheet3. GND3/8 to logic GND. NC6/7/9/10 may be pass-through pads; preserve isolation.", Manufacturer="Texas Instruments", CAD Status=CAD_CANDIDATE, Limitations="PHY-side only, per DP83826EVM sheet3. GND3/8 to logic GND. NC6/7/9/10 may be pass-through pads; preserve isolation.", Manufacturer Part Number=TPD4E05U06DQAR, Source="TI SLVSBO7O table4-2 p4; DQA0010A 4220328/A board/stencil pp29-30"
D4: "Bourns CDSOT23-SM712 saved2026-11-07 pp1-2 pin diagram and Recommended Footprint; CAD mapping supported; no transferred 1kV surge rating for THVD1420. Populate only after protection qualification.", Manufacturer=Bourns, CAD Status=CAD_CANDIDATE, Limitations="CAD mapping supported; no transferred 1kV surge rating for THVD1420. Populate only after protection qualification.", Manufacturer Part Number=CDSOT23-SM712, Source="Bourns CDSOT23-SM712 saved2026-11-07 pp1-2 pin diagram and Recommended Footprint"
F1: "User-approved2A125VDC fuse; manufacturer dimensioned native footprint linked. Nonpolar terminals project1/2; supervised current-limited lab source. Not electrically tested.", Manufacturer=Littelfuse, CAD Status=CAD_VERIFIED, Datasheet=https://www.littelfuse.com/assetdocs/fuse-451-and-453-datasheet?assetguid=533cd5cc-956c-4243-867f-6ab5a62f6ba1, Design Approval=PROTOTYPE_APPROVED, Electrical Approval=PROTOTYPE_APPROVED, Electrical Test=NOT_TESTED, Limitations="User-approved2A125VDC fuse; manufacturer dimensioned native footprint linked. Nonpolar terminals project1/2; supervised current-limited lab source. Not electrically tested.", Manufacturer Part Number=0451002.MRL, Source="Official451/453 series Rev01-Dec-2025 pp1-4; electrical row002 and ordering"
J1: "2~24 Poles, Screw Type, Horizontal, 5.0 Pitch, 22~12 (AWG), Terminal Block Connector", Manufacturer="Same Sky (Formerly CUI Devices)", Package=None, Check_prices=https://www.snapeda.com/parts/TB002-500-02BE/Same+Sky/view-part/?ref=eda, Manufacturer Part Number=TB002-500-02BE, MF="Same Sky", MP=TB002-500-02BE, SnapEDA_Link=https://www.snapeda.com/parts/TB002-500-02BE/Same+Sky/view-part/?ref=snap
J2: "Cinch/Stewart CT710001 revB0 10-Jul-2023 component-side recommended hole layout; Numbered contacts per component-side drawing. S1/S2 are project labels for unnumbered shield tabs; MP1/2 are non-electrical mounting holes. Candidate copper lands; sourcing risk separate.", Manufacturer="Cinch / Stewart", CAD Status=CAD_CANDIDATE, Limitations="Numbered contacts per component-side drawing. S1/S2 are project labels for unnumbered shield tabs; MP1/2 are non-electrical mounting holes. Candidate copper lands; sourcing risk separate.", Manufacturer Part Number=SS-7188S-A-NF, Source="Cinch/Stewart CT710001 revB0 10-Jul-2023 component-side recommended hole layout"
J3: library part GW_H_Male_6x1_TH_100mil_c0450d1e, "TBD; 6 posiciones; TBD; CAD_CANDIDATE", Manufacturer="Wurth Elektronik", Manufacturer Part Number=61300611121, Package=TBD, Power Rating=N/A, CAD_Limitations="Glyph pins/types inspected; exact manufacturer land-pattern/mask/paste qualification pending.", CAD_Source="Professor_shared.SchLib glyph H_Male_6x1_TH_100mil", CAD_Status=CAD_CANDIDATE, Electrical_Notes="Pinout, MPN y orientacion pendientes. No alimentar VDD desde VTref; SWD PA13/PA14 y NRST. Modelo candidato existente; sin cotejo visual de pads/pines en Altium.", Electrical_Status=PROVISIONAL, Rating=TBD, Source="schematic_construction_guide.md line 410, manufacturer PDF not in repo, IPC-7351 generic 2.54 mm land used", Tolerance=TBD
J4 J5 J6 J7 J9 J10: "Same Sky TB002-500 Rev1.04 09/12/2024 p1 order key,p2 PCB layout; project contact1left in PCBtopview with wire entry facing-Y;not manufacturer polarity", Manufacturer="Same Sky (formerly CUI Devices)", CAD Status=CAD_VERIFIED_GEOMETRY;NATIVE_PLACEMENT_PENDING, Datasheet=sources/autonomous_closure/tb002-500.pdf, Electrical Status=DERIVED_PENDING_REVIEW, Physical Mapping="Project-defined1left then+X in PCBtopview; wire-entryfront-Y. Confirm wire polarity against silk before bringup.", Source="Same Sky TB002-500 Rev1.04 09/12/2024 p1 order key,p2 PCB layout"
  J4 J9 J10: Manufacturer Part Number=TB002-500-03BE
  J5 J6 J7: Manufacturer Part Number=TB002-500-02BE
J8: library part GW_H_Male_2x1_TH_100mil_f89d9046, "TBD; 2 posiciones; TBD; CAD_CANDIDATE", Manufacturer="Wurth Elektronik", Manufacturer Part Number=61300211121, Package=TBD, Power Rating=N/A, CAD_Limitations="Glyph pins/types inspected; exact manufacturer land-pattern/mask/paste qualification pending.", CAD_Source="Professor_shared.SchLib glyph H_Male_2x1_TH_100mil", CAD_Status=CAD_CANDIDATE, Electrical_Notes="Pinout, MPN y orientacion pendientes. No alimentar VDD desde VTref; SWD PA13/PA14 y NRST. Modelo candidato existente; sin cotejo visual de pads/pines en Altium.", Electrical_Status=PROVISIONAL, Rating=TBD, Source="schematic_construction_guide.md line 410, manufacturer PDF not in repo, IPC-7351 generic 2.54 mm land used", Tolerance=TBD
L1: library part GW_XAL4030-682MEC_71dfd711, "XAL4030-682MEC; 6.8 uH; Isat25C 3.6 A; Irms20C 3.0 A; CAD_CANDIDATE", Manufacturer=Coilcraft, Manufacturer Part Number=XAL4030-682MEC, Package=XAL4030, Power Rating=N/A, Rating="Isat25C 3.6 A; Irms20C 3.0 A", Tolerance=20%, CAD_Limitations="Symbol only. Exact manufacturer land pattern absent locally; footprint blocked. Ratings copied from provisional BOM, not newly approved.", CAD_Source="Professor_shared.SchLib glyph Inductor_10uH_4A_7.2*6.6mm", CAD_Status=CAD_BLOCKED, Electrical_Notes="DCRmax25C 74.1 mOhm. Isat es caida30% tipica; falta derating caliente/curva L(I)/perdidas nucleo y CAD. No usar inductor docente sin Isat verificable.", Electrical_Status=PROVISIONAL
L2: library part GW_XAL4040-103MEC_b36cb917, "XAL4040-103MEC; 10 uH; Isat25C 3.0 A; Irms20C 2.2 A; CAD_CANDIDATE", Manufacturer=Coilcraft, Manufacturer Part Number=XAL4040-103MEC, Package=XAL4040, Power Rating=N/A, Rating="Isat25C 3.0 A; Irms20C 2.2 A", Tolerance=20%, CAD_Limitations="Symbol only. Exact manufacturer land pattern absent locally; footprint blocked. Ratings copied from provisional BOM, not newly approved.", CAD_Source="Professor_shared.SchLib glyph Inductor_10uH_4A_7.2*6.6mm", CAD_Status=CAD_BLOCKED, Electrical_Notes="DCRmax25C 92.4 mOhm. Isat es caida30% tipica; falta derating caliente/curva L(I)/perdidas nucleo y CAD. No usar inductor docente sin Isat verificable.", Electrical_Status=PROVISIONAL
Q1 Q3: "Diodes DS30036 Rev27-2 March2025 p1 top view/order, p3 electrical, p6 suggested lands; conventional NPN symbol; used in5V BSP input driver,NOT24V load path", Manufacturer="Diodes Incorporated", CAD Status=CAD_VERIFIED_GEOMETRY;NATIVE_PLACEMENT_PENDING, Datasheet=sources/autonomous_closure/MMBT3904.pdf, Electrical Status=DERIVED_PENDING_REVIEW, Manufacturer Part Number=MMBT3904-7-F, Source="Diodes DS30036 Rev27-2 March2025 p1 top view/order, p3 electrical, p6 suggested lands", Terminal Mapping="Top view tab/lead above C/D; lower-left B/G; lower-right E/S; manufacturer functional IDs, no guessed numbers"
Q2 Q4: "Diodes DS31830 Rev11-2 June2025 p1 top view/order,p2 electrical,p6 suggested lands; conventional PMOS symbol; used in5V BSP input driver,NOT24V load path", Manufacturer="Diodes Incorporated", CAD Status=CAD_VERIFIED_GEOMETRY;NATIVE_PLACEMENT_PENDING, Datasheet=sources/autonomous_closure/DMP2035U.pdf, Electrical Status=DERIVED_PENDING_REVIEW, Manufacturer Part Number=DMP2035U-7, Source="Diodes DS31830 Rev11-2 June2025 p1 top view/order,p2 electrical,p6 suggested lands", Terminal Mapping="Top view tab/lead above C/D; lower-left B/G; lower-right E/S; manufacturer functional IDs, no guessed numbers"
R1: "768kOhm1%0.1W75V; Exact Yageo spec; manufacturer Mounting2018p4Fig4/Table1", Manufacturer=Yageo, CAD Status=CAD_VERIFIED, Datasheet=https://yageogroup.com/download/specsheet/RC0603FR-07768KL, Design Approval=PROPOSED_APPLICATION_VALUE, Electrical Test=NOT_TESTED, Manufacturer Part Number=RC0603FR-07768KL, Source="Exact Yageo spec, manufacturer Mounting2018p4Fig4/Table1"
R2: "13.3kOhm1%0.1W75V; Exact Yageo spec; manufacturer Mounting2018p4Fig4/Table1", Manufacturer=Yageo, CAD Status=CAD_VERIFIED, Datasheet=https://yageogroup.com/download/specsheet/RC0603FR-0713K3L, Design Approval=PROPOSED_APPLICATION_VALUE, Electrical Test=NOT_TESTED, Manufacturer Part Number=RC0603FR-0713K3L, Source="Exact Yageo spec, manufacturer Mounting2018p4Fig4/Table1"
R3: "33.2kOhm1%0.1W75V; Exact Yageo spec; manufacturer Mounting2018p4Fig4/Table1", Manufacturer=Yageo, CAD Status=CAD_VERIFIED, Datasheet=https://yageogroup.com/download/specsheet/RC0603FR-0733K2L, Design Approval=PROPOSED_APPLICATION_VALUE, Electrical Test=NOT_TESTED, Manufacturer Part Number=RC0603FR-0733K2L, Source="Exact Yageo spec, manufacturer Mounting2018p4Fig4/Table1"
R4: "30.1kOhm1%0.1W75V; Exact Yageo spec; manufacturer Mounting2018p4Fig4/Table1", Manufacturer=Yageo, CAD Status=CAD_VERIFIED, Datasheet=https://yageogroup.com/download/specsheet/RC0603FR-0730K1L, Design Approval=PROPOSED_APPLICATION_VALUE, Electrical Test=NOT_TESTED, Manufacturer Part Number=RC0603FR-0730K1L, Source="Exact Yageo spec, manufacturer Mounting2018p4Fig4/Table1"
R5 R6 R8 R9: library part GW_RC0603FR-07100KL_ac663db8, "RC0603FR-07100KL; 100 kOhm; 75 V max; limite sqrt(P*R); CAD_CANDIDATE", Manufacturer=Yageo, Manufacturer Part Number=RC0603FR-07100KL, Package=0603, Power Rating="0.1 W @70 C", Rating="75 V max; limite sqrt(P*R)", Tolerance=1%, CAD_Limitations="Glyph pins/types inspected; exact manufacturer land-pattern/mask/paste qualification pending.", CAD_Source="Professor_shared.SchLib glyph Res_10k_0603_1/10W", CAD_Status=CAD_CANDIDATE, Electrical_Notes="Vout nominal calculado 3.31481 V; ver esquinas de tolerancia. Cambiar parametros en copia docente. Modelo candidato existente; sin cotejo visual de pads/pines en Altium.", Electrical_Status=PROVISIONAL
R7: library part GW_RC0603FR-0743K2L_a8308c0c, "RC0603FR-0743K2L; 43.2 kOhm; 75 V max; limite sqrt(P*R); CAD_CANDIDATE", Manufacturer=Yageo, Manufacturer Part Number=RC0603FR-0743K2L, Package=0603, Power Rating="0.1 W @70 C", Rating="75 V max; limite sqrt(P*R)", Tolerance=1%, CAD_Limitations="Glyph pins/types inspected; exact manufacturer land-pattern/mask/paste qualification pending.", CAD_Source="Professor_shared.SchLib glyph Res_10k_0603_1/10W", CAD_Status=CAD_CANDIDATE, Electrical_Notes="Vout nominal calculado 3.31481 V; ver esquinas de tolerancia. Cambiar parametros en copia docente. Modelo candidato existente; sin cotejo visual de pads/pines en Altium.", Electrical_Status=PROVISIONAL
R10: library part GW_RC0603FR-0724K9L_10698e9e, "RC0603FR-0724K9L; 24.9 kOhm; 75 V max; limite sqrt(P*R); CAD_CANDIDATE", Manufacturer=Yageo, Manufacturer Part Number=RC0603FR-0724K9L, Package=0603, Power Rating="0.1 W @70 C", Rating="75 V max; limite sqrt(P*R)", Tolerance=1%, CAD_Limitations="Glyph pins/types inspected; exact manufacturer land-pattern/mask/paste qualification pending.", CAD_Source="Professor_shared.SchLib glyph Res_10k_0603_1/10W", CAD_Status=CAD_CANDIDATE, Electrical_Notes="Vout nominal calculado 5.01606 V; ver esquinas de tolerancia. Cambiar parametros en copia docente. Modelo candidato existente; sin cotejo visual de pads/pines en Altium.", Electrical_Status=PROVISIONAL